# Altium PCB BetaBake_REV_1.0.PcbDoc (part 7 of 8)
Units mil, origin at the board's own origin, x right, y up, seen from the top; angles counter-clockwise.
Board outline 6000 x 4000 mil, 8 copper layers (USB 2.0 (90 Diff) DDR3 Data (50-100), GND (Top Layer high-speed return paths), DDR3 Fly-by Routing (Address, Command, Control), QSPI Flash (Clk, IO), Int4 PWR, Int5 GND (Shielding between L4 and L6), Int6 eMMC High-Speed Data Lines (8-bit bus), SDIO/peripherals, Int7 GND, Escapes, non-critical tracks, decoupling capacitor vias), stack 60.424 mil thick; 426 components, 331 nets, 1941 pads, 428 vias.
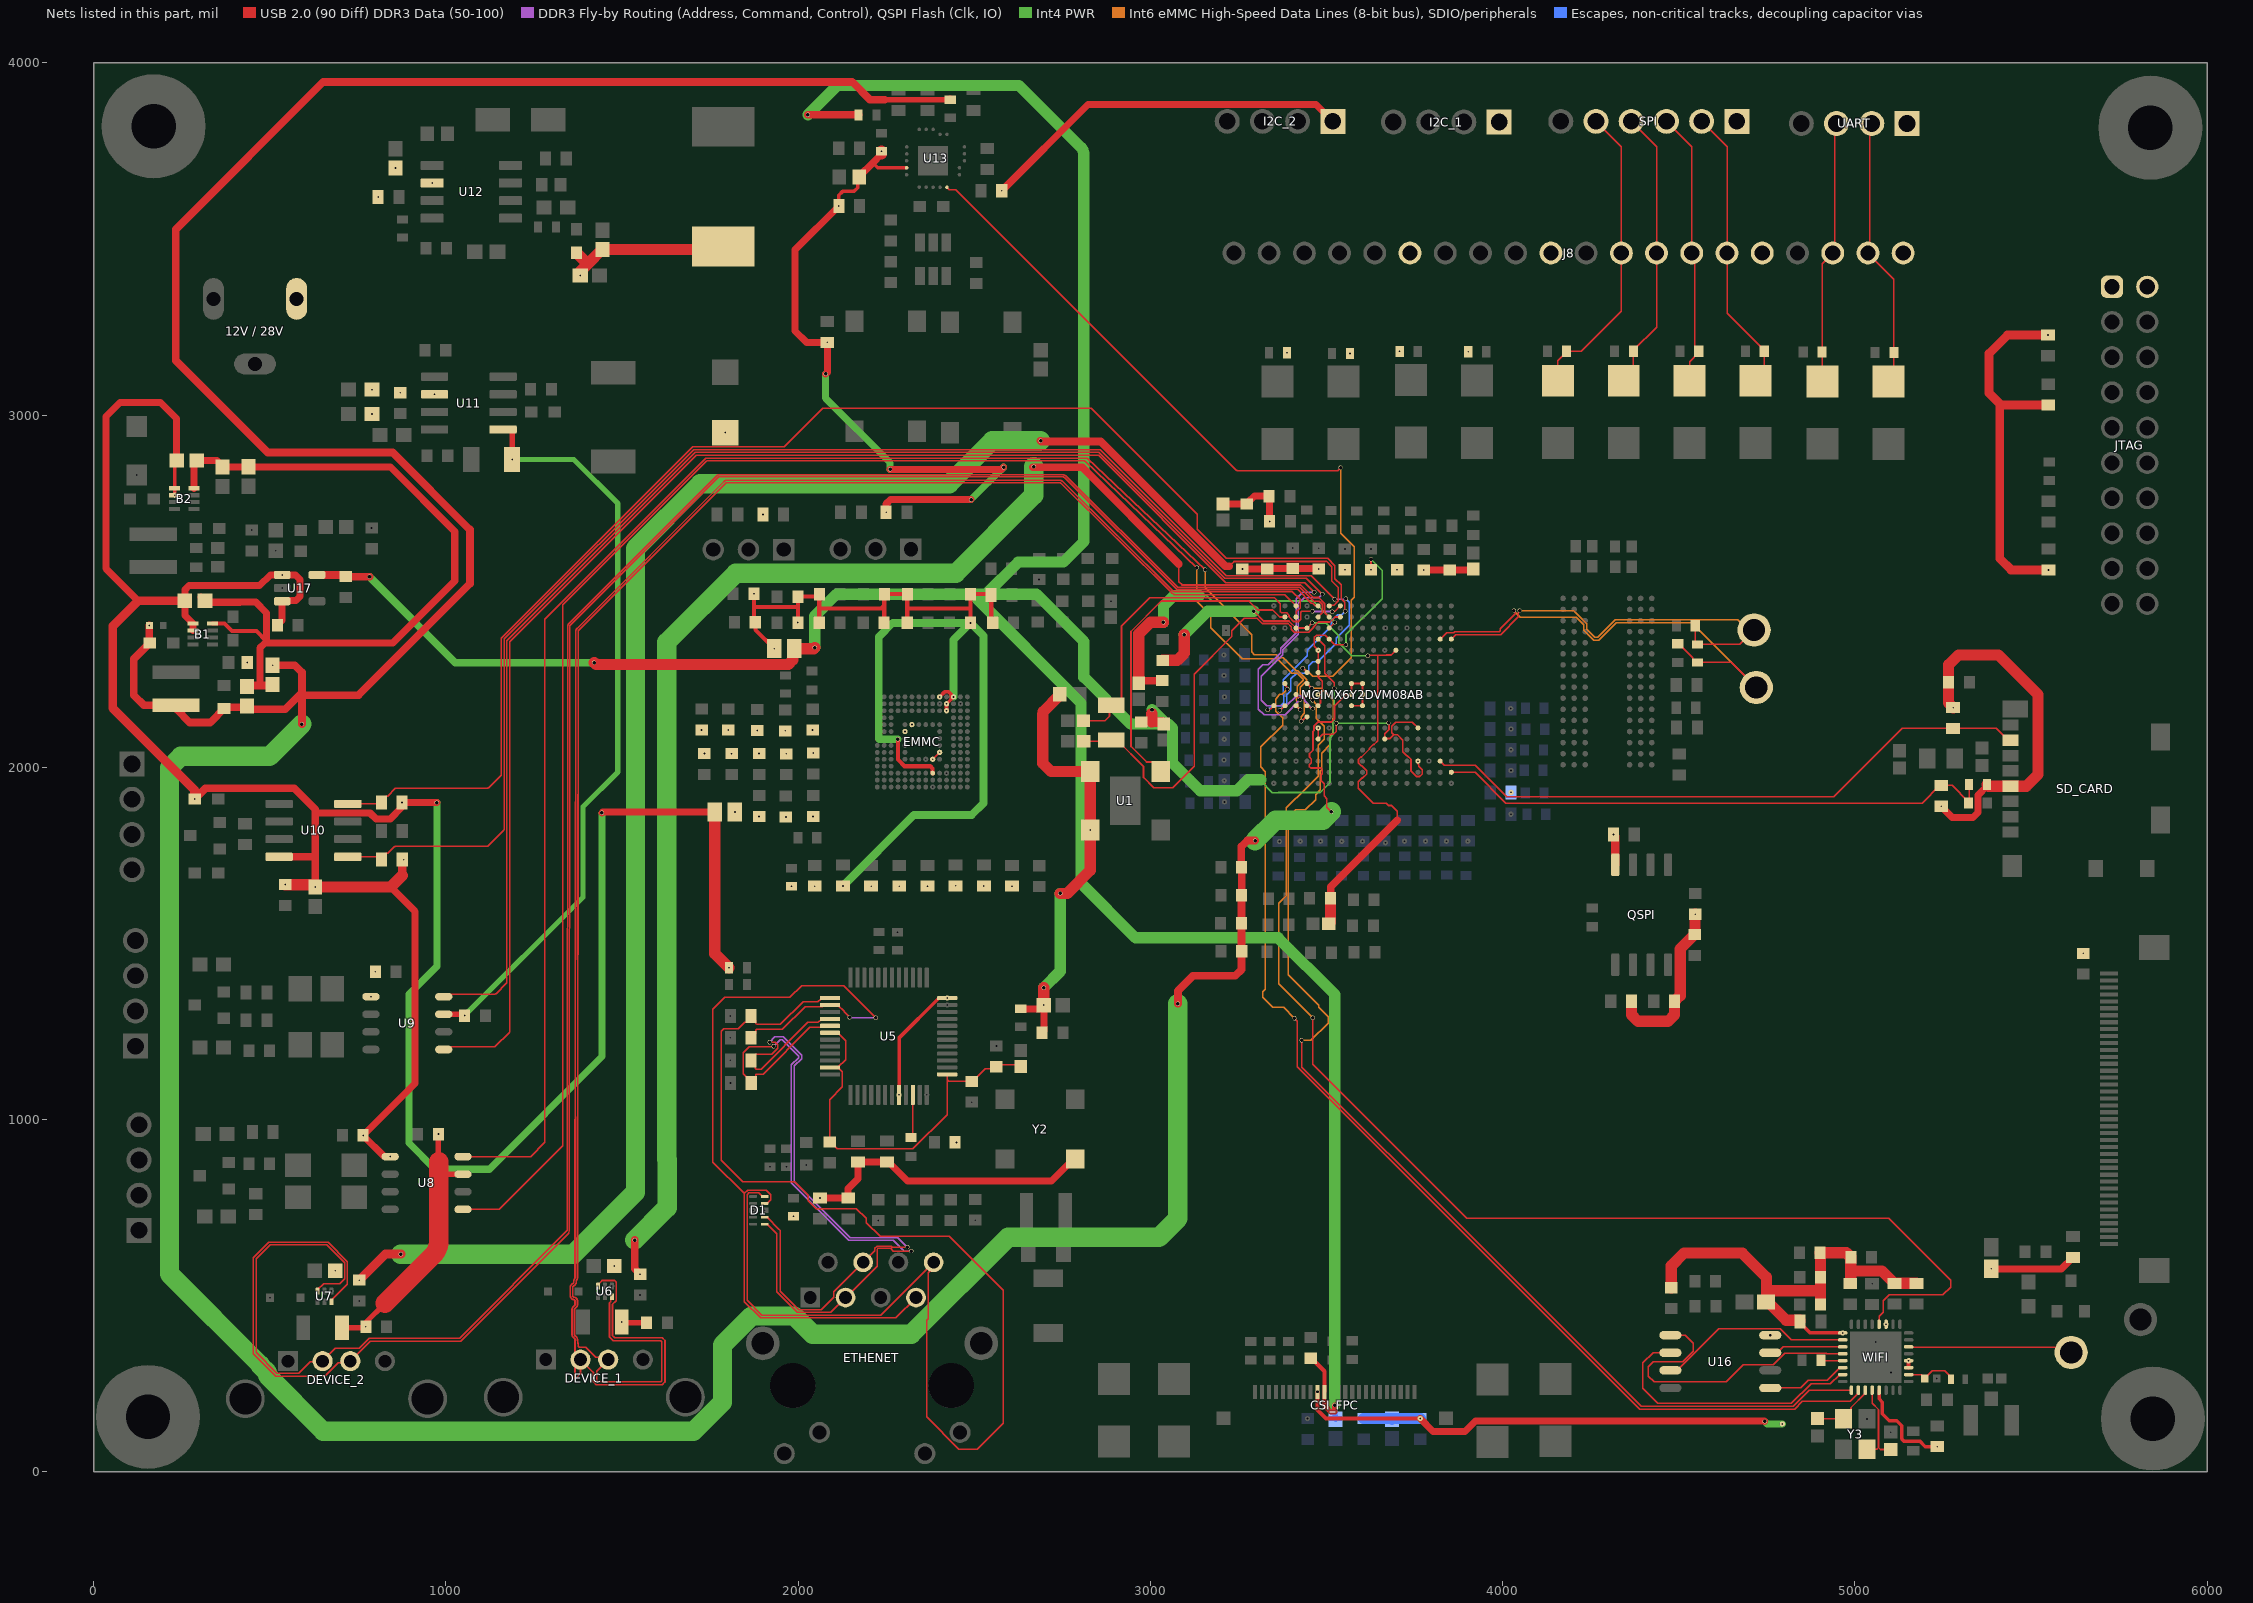
[diagram p12: the nets of this part, all layers, seen from the top]

## Via types
v1: diameter 12, hole 10, USB 2.0 (90 Diff) DDR3 Data (50-100) to Escapes, non-critical tracks, decoupling capacitor vias, 382 vias
v2: diameter 50, hole 26, USB 2.0 (90 Diff) DDR3 Data (50-100) to Escapes, non-critical tracks, decoupling capacitor vias, 28 vias
v3: diameter 19.68, hole 7.87, USB 2.0 (90 Diff) DDR3 Data (50-100) to Escapes, non-critical tracks, decoupling capacitor vias, 9 vias
v4: diameter 23.62, hole 11.81, USB 2.0 (90 Diff) DDR3 Data (50-100) to Escapes, non-critical tracks, decoupling capacitor vias, 5 vias
v5: diameter 7.87, hole 7.87, USB 2.0 (90 Diff) DDR3 Data (50-100) to Escapes, non-critical tracks, decoupling capacitor vias, 4 vias

## Nets (pads, with @x,y where several pads share a name; then routed paths per layer and width w, separated by ;. In a path a pad name is that pad's centre, name@x,y a point inside that pad or via, vN(x,y) a via of type N, cw(c..) or ccw(c..) an arc to the next point about the centre after c; other vN are vias at no path point) (continued)
NetU8_1: MCIMX6Y2DVM08AB.H15 U8.1 | length 4607.2
  USB 2.0 (90 Diff) DDR3 Data (50-100) w4: U8.1@1048.35,745 1151,745 1330.35,924.35 ccw(c1327.52,927.18) 1331.52,927.18 1331.52,2459.89 cw(c1335.52,2459.86) 1332.67,2462.67 1738.67,2868.67 cw(c1741.5,2865.84) 1741.5,2869.84 2812.12,2869.84 cw(c2812.12,2865.84) 2814.92,2868.7 ; 2814.94,2868.68 v1(3132,2567) ; MCIMX6Y2DVM08AB.H15@3413.27,2174.99 3413.64,2174.99 3424.63,2164 v1(3425,2164)
  Int6 eMMC High-Speed Data Lines (8-bit bus), SDIO/peripherals w4: v1(3132,2567) 3132,2471 3171.97,2431.03 3171.97,2396.76 3260.24,2308.49 3359.49,2308.49 3401,2266.97 3401.29,2267.26 3416.24,2267.26 3433.49,2250.02 3433.49,2246.7 3417,2230.21 3417,2202.08 3416.17,2201.25 ccw(c3419,2198.43) 3415.02,2198.82 3414.41,2192.63 ccw(c3424.36,2191.64) 3414.44,2190.38 3414.86,2187.08 ccw(c3418.83,2187.58) 3415.98,2184.78 ; 3416,2184.76 3416.17,2184.58 3416.17,2183.4 3417.93,2181.64 3417.93,2171.07 v1(3425,2164)
NetU8_4: MCIMX6Y2DVM08AB.G14 U8.4 | length 4557.6
  USB 2.0 (90 Diff) DDR3 Data (50-100) w4: U8.4@1048.35,895 1241,895 1281,935 1281,2421 1738.19,2878.19 2817.97,2878.19 cw(c2817.97,2874.19) 2820.72,2877.1 v1(3155,2561) ; v1(3428,2131) 3430.13,2131 3442.63,2143.5 MCIMX6Y2DVM08AB.G14@3444.76,2143.5
  Int6 eMMC High-Speed Data Lines (8-bit bus), SDIO/peripherals w4: v1(3155,2561) 3155,2509.32 3287.28,2377.04 3287.28,2327.53 3295.22,2319.59 3356.86,2319.59 3364.8,2311.66 3377,2311.66 3414.54,2274.11 3417.88,2274.11 3443.39,2248.6 3443.39,2245.29 3425,2226.9 3425,2207.97 3437,2195.97 3437,2153.03 3428,2144.03 v1(3428,2131)
NetU9_1: MCIMX6Y2DVM08AB.J15 U9.1 | length 4567.4
  USB 2.0 (90 Diff) DDR3 Data (50-100) w4: U9.1@993.69,1199 999.88,1205.19 cw(c1002.71,1202.36) 1002.71,1206.36 1137.34,1206.36 ccw(c1137.34,1210.36) 1140.16,1207.52 1179.84,1247.2 ccw(c1177,1250.02) 1181,1250.02 1181,2355.06 cw(c1185,2355.03) 1182.15,2357.83 1709.22,2884.91 cw(c1712.05,2882.08) 1712.05,2886.08 2811,2886.08 2852.92,2886.08 3214.5,2524.5 3437.5,2524.5 v1(3465,2497) ; MCIMX6Y2DVM08AB.J15@3413.27,2206.49 3413.27,2204.61 MCIMX6Y2DVM08AB.J15@3415.4,2202.48 ; MCIMX6Y2DVM08AB.J15@3415.43,2202.45 cw(c3412.54,2199.68) 3415.63,2202.23 v1(3424.36,2191.64)
  DDR3 Fly-by Routing (Address, Command, Control), QSPI Flash (Clk, IO) w4: v1(3424.36,2191.64) 3384.21,2150.21 cw(c3381.34,2153) 3381.34,2149 3322.51,2149 3306.51,2165 3306.51,2278.59 3318.92,2291 3335,2291 3370.05,2326.05 3370.05,2337.91 3414.18,2382.04 3414.18,2479.18 3432,2497 v1(3465,2497)
NetU9_4: MCIMX6Y2DVM08AB.H14 U9.4 | length 4467.7
  USB 2.0 (90 Diff) DDR3 Data (50-100) w4: U9.4@993.69,1349 999.88,1355.19 cw(c1002.71,1352.36) 1002.71,1356.36 1139.34,1356.36 ccw(c1139.34,1360.36) 1142.16,1357.52 1171.84,1387.2 ccw(c1169,1390.02) 1173,1390.02 1173,2358.37 cw(c1177,2358.34) 1174.15,2361.15 1705.91,2892.91 cw(c1708.74,2890.08) 1708.74,2894.08 2852.26,2894.08 cw(c2852.26,2890.08) 2855.09,2892.91 3205.83,2542.17 3210.49,2537.51 3442.49,2537.51 v1(3488,2492) ; MCIMX6Y2DVM08AB.H14@3444.76,2174.99 3447.62,2174.99 3454.08,2168.53 3459.47,2168.53 v1(3461,2167)
  DDR3 Fly-by Routing (Address, Command, Control), QSPI Flash (Clk, IO) w4: v1(3461,2167) 3459.83,2167 3437.94,2188.89 3437.94,2192.21 3427.14,2203 3414.88,2203 3386.29,2174.41 3330.96,2174.41 3314.51,2190.86 3314.51,2258.31 3376.05,2319.85 3376.05,2334.19 3420.18,2378.32 3420.18,2465.37 3436.89,2482.08 3478.08,2482.08 v1(3488,2492)
NetU13_20: MCIMX6Y2DVM08AB.L14 U13.20 | length 2199.4
  USB 2.0 (90 Diff) DDR3 Data (50-100) w4: U13.20@2422.45,3646.74 2428.77,3640.43 2447.55,3640.43 3244.14,2843.83 ; 3244.16,2843.81 ccw(c3246.97,2846.66) 3246.97,2842.66 3531.37,2842.66 3539.72,2851 v1(3540,2851) ; v1(3432.75,2281.87) 3432.75,2281.68 3444.76,2269.67 MCIMX6Y2DVM08AB.L14@3444.76,2269.48
  Int6 eMMC High-Speed Data Lines (8-bit bus), SDIO/peripherals w4: v1(3432.75,2281.87) 3434.61,2281.87 3442.17,2274.32 3444.99,2274.32 3460.31,2259 3518,2259 3570.75,2311.75 3570.75,2474.78 3579,2483.03 3579,2626.03 3540,2665.03 v1(3540,2851)
NetU15_6: WIFI.6 WIFI_TOUT.1 | length 468.1
  USB 2.0 (90 Diff) DDR3 Data (50-100) w4: WIFI.6@5152.5,354.83 5153.62,353.72 5599.28,353.72 WIFI_TOUT.1@5614,339
NetU15_12: MCIMX6Y2DVM08AB.J14 WIFI.12 | length 3527.8
  USB 2.0 (90 Diff) DDR3 Data (50-100) w4: MCIMX6Y2DVM08AB.J14@3444.76,2206.49 3444.76,2205.86 3450.41,2200.21 ccw(c3453.24,2203.04) 3450.62,2200.02 3460.95,2191.05 3460.95,2190.95 v1(3460.3,2190.3) ; v1(3461,1289) 3461,1157 3898.34,719.66 5096.34,719.66 5272,544 5272,524 5250,502 5096.91,502 5080,485.09 5080,453 5068.84,441.84 WIFI.12@5068.84,418.81
  Int6 eMMC High-Speed Data Lines (8-bit bus), SDIO/peripherals w4: v1(3460.3,2190.3) 3471,2179.6 3471,2139.13 3493.13,2117 3493.13,2079.65 3476.26,2062.78 3476.26,1974.27 3442.85,1940.86 3441.89,1940.86 3385.87,1884.84 3385.87,1634.91 3365,1614.05 3365,1385 v1(3461,1289)
NetU15_25: MCIMX6Y2DVM08AB.K14 WIFI.25 | length 3276.9
  USB 2.0 (90 Diff) DDR3 Data (50-100) w4: v1(3429,1225) 3429,1150.24 3430.17,1149.07 3917.24,662 4393.24,186 4825,186 4870.8,231.8 WIFI.25@4990.1,231.8 ; MCIMX6Y2DVM08AB.K14@3444.76,2237.98 v1(3457.86,2225.14)
  Int6 eMMC High-Speed Data Lines (8-bit bus), SDIO/peripherals w4: v1(3429,1225) 3455.69,1225 3504.34,1273.66 3504.34,1291.66 3477.48,1318.52 3477.48,1325 3391.87,1410.61 3391.87,1857.91 3412.91,1878.96 3440.04,1878.96 3469,1907.92 3469,1922.42 3482.32,1935.75 3482.32,1988.73 3486.25,1992.66 3486.25,2040.64 3510.78,2065.17 3510.78,2089.42 3518.16,2096.81 3518.16,2106.14 3519.26,2107.24 3519.26,2119.6 3518,2120.86 3518,2137.48 3519.26,2138.73 3519.26,2190.41 3484.53,2225.14 v1(3457.86,2225.14)
NetU15_26: MCIMX6Y2DVM08AB.K16 WIFI.26 | length 3232.3
  USB 2.0 (90 Diff) DDR3 Data (50-100) w4: MCIMX6Y2DVM08AB.K16@3381.77,2237.98 3381.77,2235.12 3387.47,2229.43 3387.47,2223.77 v1(3389,2222.24) ; v1(3409,1288) 3409,1287.03 3417,1279.03 3417,1150 4389,178 4829,178 4851,200 4986.84,200 5009.79,222.94 WIFI.26@5009.79,231.8
  Int6 eMMC High-Speed Data Lines (8-bit bus), SDIO/peripherals w4: v1(3389,2222.24) 3374.1,2207.34 3367.37,2207.34 3358.33,2198.3 3358.33,2195.47 3356,2193.14 3356,2159.39 3375,2140.39 3375,2120.03 3313,2058.03 3313,2001.31 3326.65,1987.66 3326.65,1370.35 3319,1362.69 3319,1347.51 3347.99,1318.52 3378.48,1318.52 v1(3409,1288)
NVCC_CSI: B1.1 B1.2 B2.1 B2.2 C1.1 C2.1 C3.1 C6.1 C15.1 C16.1 C17.1 C22.1 C23.1 C27.1 C30.2 C31.2 C37.1 C38.1 C39.1 C50.2 C81.1 C82.1 C83.1 C91.2 C98.2 C106.2 C111.2 C114.2 C115.2 C116.1 C127.2 C130.2 C131.2 C138.2 C144.1 C152.2 C154.2 C159.2 C164.2 C167.2 C169.2 C170.2 C245.1 C356.2 CSI_FPC.10 FB1.1 FB4.2 FB6.1 I2C_1.1 I2C_2.1 J8.1 J8.5 J8.11 J8.15 JTAG.1 JTAG.2 L5.2 MCIMX6Y2DVM08AB.C4 MCIMX6Y2DVM08AB.E7 MCIMX6Y2DVM08AB.E13 MCIMX6Y2DVM08AB.F4 MCIMX6Y2DVM08AB.F13 MCIMX6Y2DVM08AB.H13 MCIMX6Y2DVM08AB.J13 MCIMX6Y2DVM08AB.L13 MCIMX6Y2DVM08AB.M13 MCIMX6Y2DVM08AB.N13 MCIMX6Y2DVM08AB.P12 pad.18 pad.19 pad.21 pad.22 pad.23 pad.24 pad.27 pad.28 pad.29 pad.45 pad.46 pad.61 pad.62 pad.67 pad.69 pad.71 pad.73 pad.74 pad.134 pad.165 pad.189 pad.190 pad.192 pad.193 pad.196 pad.206 pad.211 pad.227 pad.229 pad.233 pad.242 pad.248 pad.249 pad.251 pad.252 pad.253 pad.254 pad.255 pad.256 pad.257 pad.258 pad.259 pad.260 pad.261 pad.262 pad.266 pad.267 pad.268 pad.269 pad.270 pad.271 pad.273 pad.302 pad.305 pad.306 pad.307 pad.309 pad.310 pad.311 pad.312 pad.314 pad.315 pad.318 pad.321 pad.323 pad.324 QSPI.8 R1.2 R2.2 R3.2 R4.2 R5.1 R48.2 R49.2 R52.1 R66.1 R67.1 R68.1 R71.2 R72.2 R74.2 R75.2 R77.2 R82.2 R85.1 R97.1 R99.1 R100.2 R104.1 R131.1 R132.1 R133.1 R147.2 R156.2 R157.2 R158.2 R160.1 R179.1 R180.1 R181.2 R182.2 R183.2 SD_CARD.4 SPI.1 U1.1 U1.4 U5.32 U5.48 U8.5 U9.5 U10.8 U13.14 U16.8 U17.1 U17.3 UART.1 VDD_SNVS.1 WIFI.3 WIFI.4 WIFI.11 WIFI.17 WIFI.29 Y2.4 | length 22134.4
  USB 2.0 (90 Diff) DDR3 Data (50-100) w4: MCIMX6Y2DVM08AB.J13@3476.26,2206.49 3487.54,2217.77 3487.54,2244.32 3476.26,2255.61 MCIMX6Y2DVM08AB.L13@3476.26,2269.48 ; MCIMX6Y2DVM08AB.N13@3476.26,2332.47 3464.98,2343.76 3464.98,2368.64 3471.59,2375.25 3496.47,2375.25 MCIMX6Y2DVM08AB.P12@3507.76,2363.97 3523.72,2348 v1(3555,2348)
  USB 2.0 (90 Diff) DDR3 Data (50-100) w5: MCIMX6Y2DVM08AB.F13@3476.26,2112 MCIMX6Y2DVM08AB.E13@3476.26,2080.5 3489.7,2093.94 3519.67,2093.94 3527.47,2101.73 3527.47,2124.47 v1(3528,2125) ; MCIMX6Y2DVM08AB.H13@3476.26,2174.99 3482.97,2181.7 3482.97,2199.78 MCIMX6Y2DVM08AB.J13@3476.26,2206.49 ; MCIMX6Y2DVM08AB.L13@3476.26,2269.48 MCIMX6Y2DVM08AB.N13@3476.26,2332.47 ; C31.2@3626.24,2560.98 v1(3626.24,2590.51) ; v1(3676,2126) 3677.02,2124.98 3677.02,2107.12 3665.24,2095.34 3665.24,2082.89 3666.43,2081.7 3680.02,2081.7 3690.61,2092.29 ; MCIMX6Y2DVM08AB.C4@3759.72,2017.51 3761.55,2003.09 3771.51,1993.14 3771.51,1981.14 3764.61,1974.23 3754.77,1974.23 3740.01,1988.99 3740.01,2022.39 3729.14,2033.26 3727.31,2033.26 3716.44,2044.13 3716.44,2077.46 3701.61,2092.29 3690.61,2092.29 ; MCIMX6Y2DVM08AB.F4@3759.72,2112 3743.72,2128 3696.07,2128 3684.95,2116.88 3684.95,2097.95 3690.61,2092.29
  USB 2.0 (90 Diff) DDR3 Data (50-100) w10: B2.2@229.86,2772.68 B2.1@229.86,2792.37 229.86,2865.49 C138.2@235.37,2871 ; R157.2@2115.47,3594 2115.47,3624.47 2126,3635 2158,3635 2169,3646 2169,3673.43 C144.1@2173.54,3677.97 ; 2211.93,3716.35 2225.85,3702.43 U13.14@2307.7,3702.43 ; U5.32@2286.26,1070.32 2286.26,1231.64 2399.55,1344.93 U5.48@2423.07,1344.93 ; R179.1@4844.47,427 4844.47,423.06 4873.33,394.2 WIFI.17@4965.5,394.2 ; WIFI.29@5068.84,231.8 5068.84,207.16 5078,198 5078,165 5098,145 5118.82,145 5133,130.82 5133,93.3 5138.86,87.44 5183.72,87.44 5199.68,71.47 R181.2@5234,71.47
  USB 2.0 (90 Diff) DDR3 Data (50-100) w12: v5(3474.43,227) 3474.43,175.78 3498.68,151.53 pad.248@3766,151.53 ; WIFI.3@5152.5,295.78 WIFI.4@5152.5,315.46
  USB 2.0 (90 Diff) DDR3 Data (50-100) w20: 126,2473 35,2564 35,2996 75,3036 190,3036 235.37,2990.63 C138.2@235.37,2871 ; B1.2@281.86,2388.37 B1.1@281.86,2408.06 258.74,2431.17 C127.2@258.74,2473 258.74,2504.28 270.46,2516 471,2516 501.4,2546.4 U17.1@535,2546.4 572.6,2546.4 586,2533 586,2485 574.21,2473.21 536.61,2473.21 U17.3@535,2471.6 535,2417.53 C245.1@521.47,2404 ; 629,1869 629.76,1869.76 785.24,1869.76 801,1854 842.16,1854 875.53,1887.37 R97.1@875.53,1900 v1(974,1900) ; U8.5@841.65,895 825,895 C106.2@765,955 912,1102 912,1591.33 843.16,1660.16 ; v1(1443,1871) 1444.91,1872.91 FB1.1@1763.23,1872.91 ; R72.2@2062,777.53 2062.47,777.06 R74.2@2142,777.06 2142,804 2170,832 R77.2@2170,879.47 2170.53,880 R82.2@2252,880 2255.94,880 2309.94,826 2719,826 Y2.4@2787,894 ; v1(2078,3117) 2082.68,3121.68 R158.2@2082.68,3206.69 2023.31,3206.69 1991,3239 1991,3469.53 R157.2@2115.47,3594 ; C144.1@2173.54,3676 2173.54,3677.97 2211.93,3716.35 R160.1@2236.61,3741.03 ; VDD_SNVS.1@2249.86,2724.17 2249.86,2748.28 2261.57,2760 v1(2491,2760) ; v1(2261,2846) 2577,2846 v1(2583,2852) ; R156.2@2578.06,3637 2822.49,3881.43 3470.57,3881.43 I2C_2.1@3518,3834 ; R85.1@2632,1314.59 2687.02,1314.59 C91.2@2697.43,1325 2697.43,1250.95 C98.2@2692.47,1246 ; C1.1@3206,2747.33 3206.34,2747.66 3274.63,2747.66 3280.72,2753.75 3280.72,2755.72 3295,2770 C38.1@3337,2770 3337.74,2769.26 3337.74,2698.74 C37.1@3338.47,2698 ; C2.1@3261.36,2563.26 pad.311@3261.46,2563.36 3332.14,2563.36 C15.1@3332.24,2563.46 3332.76,2563.98 C27.1@3404.24,2563.98 3477.18,2563.98 C17.1@3478.24,2562.93 ; pad.248@3766,151.53 3784.07,133.46 3784.07,132.67 3802.13,114.61 3893.25,114.61 3922.75,144.11 4742.89,144.11 v1(4744,143) ; C16.1@3776.24,2559.98 C30.2@3849.24,2559.98 3913.24,2559.98 C6.1@3916.24,2562.98 ; R49.2@5245,1889.47 5276.47,1858 5335,1858 5349,1872 5349,1920.88 5375.18,1947.06 R48.2@5375.18,1951 ; FB4.2@5387,576.45 5586.97,576.45 R104.1@5619,608.47
  USB 2.0 (90 Diff) DDR3 Data (50-100) w22: R100.2@286.54,1910 317.54,1941 569,1941 629,1881 629,1869 629,1748 ; U10.8@526.5,1746.14 627.14,1746.14 629,1748 ; C114.2@629,1660.16 629,1748
  USB 2.0 (90 Diff) DDR3 Data (50-100) w23: R67.1@4314.68,1809.36 4319.68,1804.36 QSPI.8@4319.68,1723.52
  USB 2.0 (90 Diff) DDR3 Data (50-100) w25: C127.2@258.74,2473 126,2473 54,2401 54,2168 286.54,1935.46 R100.2@286.54,1910 ; 876,1693 876,1734.01 pad.21@879.99,1738 ; R132.1@5548,3227.53 5433.53,3227.53 5381,3175 5381,3062 5411,3032 ; R131.1@5549,3028.47 5414.53,3028.47 5411,3032 ; R133.1@5550,2560.47 5443.53,2560.47 5411,2593 5411,3032
  USB 2.0 (90 Diff) DDR3 Data (50-100) w32: C115.2@544,1667.06 622.11,1667.06 C114.2@629,1660.16 843.16,1660.16 876,1693 ; R147.2@1371,3461.07 1402.61,3429.46 ; C131.2@1381,3396 1381,3407.85 1402.61,3429.46 ; FB1.1@1763.23,1872.91 1763.23,1471.18 R75.2@1803.41,1431 ; L5.2@1787,3454 1771,3470 C130.2@1444,3470 1443.15,3470 1402.61,3429.46 ; R160.1@2236.61,3741.03 R160.1@2236.61,3749 ; v1(2697,1374) 2697.43,1373.57 C91.2@2697.43,1325 ; C3.1@2742.46,2207 2742.46,2205.03 2695,2157.57 2695,2152 2694,2151 2694,2012 2718,1988 U1.4@2829,1988 U1.1@2829,1822 2829,1707 2764,1642 v1(2744,1642) ; R66.1@4366.06,1336 4366.06,1297.75 4384.8,1279 4469.31,1279 4488.06,1297.75 R68.1@4488.06,1336 4504,1351.94 4504,1484.46 4544.54,1525 C81.1@4546,1525 4546,1582 C82.1@4547,1583 ; C167.2@4479,522.53 4479,585 4515,621 4680,621 4748.94,552.06 4748.94,517.5 ; R179.1@4844.47,427 4844.47,430.43 4844.22,430.69 4804.19,430.69 4752.88,482 FB6.1@4748,482 4748.94,482.94 4748.94,517.5 ; C169.2@4902.53,475 4902.53,514 ; R180.1@4987,534.77 4988.22,534.77 4988.47,535.02 4988.47,570.2 ; R183.2@5175,535.06 R182.2@5112,535.06 5076.85,570.2 4988.47,570.2 ; R52.1@5279,2169.53 5266,2182.53 C50.2@5266,2241 5266,2291 5294,2319 5408,2319 5520,2207 5520,1980 5486.68,1946.68 SD_CARD.4@5441.62,1946.68 5379.5,1946.68 R48.2@5375.18,1951 ; 4748.94,517.5 4752.44,514 4902.53,514 ; 4902.53,514 C170.2@4902.53,553 4902.53,621 C159.2@4901.53,622 4975.47,622 4986.76,610.72 4988.22,610.72 4988.47,610.46 C164.2@4988.47,609 4988.47,570.2
  Int4 PWR w4: pad.302@3700.24,2557.05 pad.302@3700.24,2560.98
  Int4 PWR w5: v1(3528,2125) 3528.5,2125.5 3675.5,2125.5 v1(3676,2126) ; v1(3555,2348) 3555,2375.95 3658,2478.95 3658,2558.75 v1(3626.24,2590.51)
  Int4 PWR w20: v1(974,1900) 974,1435 895,1356 895,933 969,859 1123.28,859 1443,1178.72 v1(1443,1871) ; v1(2078,3117) 2078,3048 2261,2865 v1(2261,2846) ; v1(2491,2760) v1(2583,2852) ; v1(4744,143) 4751,136 pad.211@4794,136
  Int4 PWR w32: v1(2697,1374) 2744,1421 v1(2744,1642)
  Escapes, non-critical tracks, decoupling capacitor vias w32: C154.2@3606,151.53 3684.05,151.53 C152.2@3686,149.58 3687.69,151.28 3765.75,151.28 pad.248@3766,151.53
  other v5: 4759.73,388 5730.09,3364.3 5830.09,3364.3
NVCC_PLL: C4.1 C5.1 C142.1 C153.2 C155.2 CSI_FPC.11 FB2.1 MCIMX6Y2DVM08AB.P13 R161.1 U17.5 | length 9773
  USB 2.0 (90 Diff) DDR3 Data (50-100) w4: MCIMX6Y2DVM08AB.P13@3476.26,2363.97 3494.57,2345.66 3494.57,2266.71 3507.31,2253.97 3507.73,2253.97 3521.97,2239.73 v1(3522,2224)
  USB 2.0 (90 Diff) DDR3 Data (50-100) w10: 3494,200 3494,226.89 CSI_FPC.11@3494.11,227
  USB 2.0 (90 Diff) DDR3 Data (50-100) w12: C155.2@3455.28,322.47 3457.25,322.47 3494.11,285.61 CSI_FPC.11@3494.11,227
  USB 2.0 (90 Diff) DDR3 Data (50-100) w15: 3494,200 3494,188 3512.09,169.91 3523.64,169.91 v1(3523.64,189.6)
  USB 2.0 (90 Diff) DDR3 Data (50-100) w22: U17.5@633.82,2546.4 701.19,2546.4 cw(c701.19,2524.4) 701.59,2546.4 708.28,2546.28 C142.1@715,2541.53 715.53,2541 v1(783,2541) ; v1(2027.59,3852.59) R161.1@2171.02,3852.59
  USB 2.0 (90 Diff) DDR3 Data (50-100) w28: 3003.53,2129 3032.96,2129 3038,2123.96 C5.1@3038,2123
  USB 2.0 (90 Diff) DDR3 Data (50-100) w32: v1(1420.7,2297.3) 1425.7,2292.3 1972,2292.3 1984.37,2304.68 1984.37,2332.23 FB2.1@1989.14,2337 2044,2337 v1(2047,2340) ; 3003.53,2129 3003.53,2152.62
  Int4 PWR w4: 3313,1964.7 3313,1962 3346.5,1928.5 3363.56,1928.5 ; 3510,2084.23 3519.26,2093.49 3519.26,2119.6 3518,2120.86 3518,2130.24 3522,2134.24 v1(3522,2224)
  Int4 PWR w5: 3363.56,1928.5 3481.64,1928.5 3510,1956.86 3510,2084.23
  Int4 PWR w22: v1(783,2541) 1026.7,2297.3 v1(1420.7,2297.3)
  Int4 PWR w32: v1(2027.59,3852.59) 2111,3936 2627,3936 2801.63,3761.37 cw(c2779,3738.75) 2811,3738.75 2811,2735 2811,2641.16 2753,2583.16 2625.16,2583.16 2533.8,2491.8 ; v1(2047,2340) 2047,2429.58 2109.21,2491.8 2494.2,2491.8 ; v1(3004.47,2163.38) 3044.85,2123 ; 3313,1964.7 3276.52,1964.7 3245.2,1933.37 3141.84,1933.37 3062.83,2012.38 3062.83,2111.46 3051.3,2123 3044.85,2123 ; v1(3523.64,189.6) 3523.64,1355 3362.64,1516 2958,1516 2803,1671 2803,2183 2494.2,2491.8 ; 2494.2,2491.8 2533.8,2491.8 ; 2533.8,2491.8 2676.06,2491.8 2811,2356.85 2811,2256 2944,2123 3044.85,2123
  Escapes, non-critical tracks, decoupling capacitor vias w15: v1(3523.64,189.6) 3523.64,163.83 C153.2@3526,149.58
PFBIN1: C94.1 C95.1 C96.1 C97.1 U5.18 U5.23 U5.37 | length 1147
  USB 2.0 (90 Diff) DDR3 Data (50-100) w4: U5.23@2090.39,1148.08 U5.23@2113.03,1148.08 ; U5.18@2090.39,1246.5 2113.03,1246.5 2135.38,1224.16 2135.4,1170.45 U5.23@2113.03,1148.08 ; U5.37@2398.48,1124.49 2402.38,1128.39 U5.37@2423.07,1128.39 2423.07,1112.53 ; C96.1@2632,1150.67 2616.16,1155 2568,1155 C95.1@2563,1150 2558,1145 2531.44,1145 2494.97,1108.53 C94.1@2493,1108.53 2427.07,1108.53 2423.07,1112.53 ; U5.23@2113.03,1148.08 2124.94,1136.17 2124.94,1092.96 2089,1057 C97.1@2089,936.53 2090.97,936.53 2110.72,916.78 2325.58,916.78 2423.07,1014.27 2423.07,1112.53
PGND: B1.8 B2.8 C122.1 C123.1 C127.1 C132.1 C133.1 C138.1 | length 2307.4
  USB 2.0 (90 Diff) DDR3 Data (50-100) w12: B1.8@336.98,2408.06 371.1,2408.06 392.43,2386.72 462.28,2386.72 491,2358
  USB 2.0 (90 Diff) DDR3 Data (50-100) w20: B2.8@284.98,2792.37 C138.1@284.98,2861.08 ; C138.1@292.63,2871.9 293.53,2871 349.53,2871 366,2854.53 C133.1@366,2852.58 366.5,2853.08 437.5,2853.08 438,2852.58 842.42,2852.58 1025,2670 1025,2529 849,2353 486,2353 ; C127.1@305.18,2482.92 315.1,2473 C127.1@316,2473 ; 414,2469 460,2469 491,2438 491,2358 486,2353 ; 471.5,2232.29 471.5,2338.5 486,2353
  USB 2.0 (90 Diff) DDR3 Data (50-100) w22: C127.1@316,2473 320,2469 414,2469 ; C122.1@435,2229.58 437.71,2232.29 471.5,2232.29 505.29,2232.29 C123.1@508,2235
RD_N: D1.5 ETHENET.8 R83.1 U5.13 | length 3783.2
  USB 2.0 (90 Diff) DDR3 Data (50-100) w4: D1.5@1904.87,781.74 1897.69,781.74 1887.75,791.68 1859.55,791.68 1854.88,787.01 1854.88,486.47 1896.6,444.74 2234.5,444.74 ETHENET.8@2384.5,594.74 2384.5,580.67 2368.9,565.06 2368.9,434 2364.5,429.61 2364.5,155.83 2456.31,64.03 2507.97,64.03 2581.5,137.56 2581.5,515.81 2428.31,669 2232.35,669 2193.81,707.54 2193.81,719.19 2165.47,747.53 2050.91,747.53 2029,769.44 2029,785 1989.82,824.18 1843.1,824.18 1782.15,885.13 1782.15,1250.91 1789.1,1257.85 1830.07,1257.85 1848.7,1276.48 1852.64,1276.48 1866.39,1290.23 R83.1@1866.39,1294.17 1879.48,1281.08 1879.48,1272.51 1881.82,1270.17 1949.17,1270.17 2013.93,1334.93 2055.8,1334.93 2063.85,1341.02 U5.13@2090.39,1344.93
RD_P: D1.4 ETHENET.7 R79.2 U5.14 | length 2436
  USB 2.0 (90 Diff) DDR3 Data (50-100) w4: R79.2@1866.39,1232.17 1879.48,1245.26 1879.48,1253.82 1881.82,1256.17 1954.96,1256.17 2019.73,1320.93 U5.14@2069.15,1320.93 ; D1.4@1904.87,762.06 1912.06,762.06 1922,771.99 1922,787.01 1909.33,799.68 1856.23,799.68 1846.88,790.32 ; U5.14@2090.39,1325.24 2113.03,1325.24 2130.16,1308.11 2130.16,1305.84 v1(2146,1290) ; v1(2220,1289) 2129,1380 2009.67,1380 1976.4,1346.73 1791.42,1346.73 1758.15,1313.47 1758.15,879.05 1846.88,790.32 ; ETHENET.7@2334.5,494.74 2276.5,436.74 1893.29,436.74 1846.88,483.15 1846.88,790.32
  DDR3 Fly-by Routing (Address, Command, Control), QSPI Flash (Clk, IO) w4: v1(2146,1290) 2146.5,1289.5 2219.5,1289.5 v1(2220,1289)
RTC_XTALI: C29.1 MCIMX6Y2DVM08AB.U11 Y1.1 | length 1083.3
  USB 2.0 (90 Diff) DDR3 Data (50-100) w4.92: C29.1@2810.33,2132 2871,2132 2884,2145 2884,2170.96 Y1.1@2889.24,2176.2 2898.51,2176.2 2917.7,2195.39 2917.7,2400.3 2998.52,2481.12 3105.34,2481.12 3352.36,2481.12 3368.94,2464.54 3368.94,2442.06 3372.3,2438.7 3386.64,2438.7 3393.52,2431.83 3393.52,2427.28 3407,2413.79 3420.18,2413.79 3427,2420.61 3427,2440.12 3429.88,2443 v1(3460,2443) ; v1(3516,2442) 3517.35,2443.35 3524.15,2443.35 MCIMX6Y2DVM08AB.U11@3539.25,2458.46
  DDR3 Fly-by Routing (Address, Command, Control), QSPI Flash (Clk, IO) w4.92: v1(3460,2443) 3460.5,2442.5 3515.5,2442.5 v1(3516,2442)
RTC_XTALO: C28.1 MCIMX6Y2DVM08AB.T11 Y1.2 | length 1206.1
  USB 2.0 (90 Diff) DDR3 Data (50-100) w4.92: C28.1@2810.66,2074 2885.46,2074 Y1.2@2889.24,2077.77 2904.98,2077.77 2980.65,2002.1 2980.65,1971.21 3009.86,1942 3063,1942 3124.36,2003.36 3124.36,2264.67 3231.09,2371.4 3231.09,2387.96 3266.74,2423.6 3302.6,2423.6 3317.99,2408.22 3390.67,2408.22 3399.54,2399.35 3399.54,2392.59 3408.4,2383.72 3449.63,2383.72 3463.27,2397.36 3463.27,2399.08 3476.91,2412.72 3510.13,2412.72 3524.36,2426.96 MCIMX6Y2DVM08AB.T11@3539.25,2426.96
RX_RS485: MCIMX6Y2DVM08AB.H16 R99.2 U10.1 | length 4260.1
  USB 2.0 (90 Diff) DDR3 Data (50-100) w4: U10.1@721.38,1746.14 808.86,1746.14 R99.2@817,1738 817,1741.94 830.75,1755.69 834.69,1755.69 853.19,1774.19 cw(c856.02,1771.36) 856.02,1775.36 1116.34,1775.36 ccw(c1116.34,1779.36) 1119.16,1776.52 1163.84,1821.2 ccw(c1161,1824.02) 1165,1824.02 1165,2361.69 cw(c1169,2361.66) 1166.15,2364.46 1702.59,2900.91 cw(c1705.42,2898.08) 1705.42,2902.08 2855.58,2902.08 cw(c2855.58,2898.08) 2858.41,2900.91 3165.64,2593.67 3215.8,2543.51 3456.49,2543.51 v1(3523,2477) ; v1(3367.69,2161.83) 3368.15,2161.83 3381.31,2174.99 MCIMX6Y2DVM08AB.H16@3381.77,2174.99
  DDR3 Fly-by Routing (Address, Command, Control), QSPI Flash (Clk, IO) w4: v1(3523,2477) 3523.87,2477.87 3554.31,2477.87 v1(3555.17,2478.73)
  Escapes, non-critical tracks, decoupling capacitor vias w4: v1(3367.69,2161.83) 3367.83,2161.83 3386.78,2180.78 3386.78,2205.87 3399,2218.09 3399,2251.33 3414.93,2267.26 3441,2267.26 3450,2276.26 3450,2289.14 3460.93,2300.07 3475.35,2300.07 3527.64,2352.36 3527.64,2366.78 3564.75,2403.89 3564.75,2469.16 v1(3555.17,2478.73)
SD1_CMD: MCIMX6Y2DVM08AB.B1 R48.1 R49.1 R50.1 | length 1600.2
  USB 2.0 (90 Diff) DDR3 Data (50-100) w4: MCIMX6Y2DVM08AB.B1@3854.21,1986.02 3921.58,1986.02 4009.22,1898.37 5190.91,1898.37 5241.06,1948.53 R49.1@5245,1948.53 5275.85,1948.53 5322.36,1902.02 R50.1@5322.36,1899 5324,1900.64 R48.1@5324,1951
SD1_DATA0: MCIMX6Y2DVM08AB.C2 R52.2 SD_CARD.7 | length 1755.4
  USB 2.0 (90 Diff) DDR3 Data (50-100) w4: MCIMX6Y2DVM08AB.C2@3822.72,2017.51 3834,2006.23 3921.77,2006.23 4011.88,1916.12 4940.12,1916.12 5134.47,2110.47 R52.2@5279,2110.47 5401.24,2110.47 5435.12,2076.6 SD_CARD.7@5441.62,2076.6
SDCLK0_N: MCIMX6Y2DVM08AB.P2 R41.1 R47.1 SDCLK0_N.1 | length 1363.2
  USB 2.0 (90 Diff) DDR3 Data (50-100) w4: MCIMX6Y2DVM08AB.P2@3822.72,2363.97 3822.9,2363.97 3841.11,2382.18 3861.11,2382.18 3863.93,2385 3990.66,2385 3993,2387.34 3993,2393 4036,2436 4036,2438.84 4032,2442.84 v1(4032,2445) ; R41.1@4497.36,2350.9 4500.38,2350.9 4539.61,2311.67 4539.61,2307.48 4549.43,2297.67 R47.1@4553.36,2297.67 4649.33,2297.67 SDCLK0_N.1@4720,2227
  Int6 eMMC High-Speed Data Lines (8-bit bus), SDIO/peripherals w4: v1(4032,2445) 4032,2444.03 4050.02,2426.01 4208.96,2426.01 4230.16,2404.81 4230.16,2388.53 4255.69,2363 4258.03,2360.66 4272.97,2360.66 4322.82,2410.51 4536.49,2410.51 SDCLK0_N.1@4720,2227
SDCLK0_P: MCIMX6Y2DVM08AB.P1 R42.1 R47.2 SDCLK0_P.1 | length 1230.8
  USB 2.0 (90 Diff) DDR3 Data (50-100) w4: MCIMX6Y2DVM08AB.P1@3854.21,2363.97 3867.24,2377 3993.97,2377 4044,2427.03 4044,2438.84 4048,2442.84 v1(4048,2445) ; R42.1@4546.65,2402.26 4546.65,2355.57 R47.2@4553.36,2348.85 4672.85,2348.85 SDCLK0_P.1@4714,2390
  Int6 eMMC High-Speed Data Lines (8-bit bus), SDIO/peripherals w4: v1(4048,2445) 4201.28,2445 4238.16,2408.13 4238.16,2391.84 4261.34,2368.66 4269.66,2368.66 4319.51,2418.51 4667.21,2418.51 4695.72,2390 SDCLK0_P.1@4714,2390 4714,2381 SDCLK0_P.1@4723,2372
SPI_CS0: D15.2 J8.8 R140.2 SPI.4 | length 805
  USB 2.0 (90 Diff) DDR3 Data (50-100) w4: D15.2@4343.71,3097.5 4371.28,3125.08 R140.2@4371.28,3181 4371.28,3184.02 4437,3249.74 J8.8@4437,3460 4437,3762 SPI.4@4365,3834
SPI_MISO: D17.2 J8.6 R138.2 SPI.2 | length 820.4
  USB 2.0 (90 Diff) DDR3 Data (50-100) w4: SPI.2@4565,3834 4637,3762 J8.6@4637,3460 4637,3289.66 4742.64,3184.02 R138.2@4742.64,3181 4742.64,3122.42 D17.2@4717.72,3097.5
SPI_MOSI: D16.2 J8.7 R139.2 SPI.3 | length 785.2
  USB 2.0 (90 Diff) DDR3 Data (50-100) w4: SPI.3@4465,3834 4537,3762 J8.7@4537,3460 4545.68,3451.32 4545.68,3191.97 R139.2@4556.64,3181 4556.64,3177.98 4530.72,3152.05 D16.2@4530.72,3097.5
SPI_SCLK: D14.2 J8.9 R141.2 SPI.5 | length 865.6
  USB 2.0 (90 Diff) DDR3 Data (50-100) w4: D14.2@4156.7,3097.5 4156.7,3153.68 4181,3177.98 R141.2@4181,3181 4222.98,3181 4337,3295.02 J8.9@4337,3460 4337,3762 SPI.5@4265,3834
TD_N: D1.2 ETHENET.4 R84.1 U5.16 | length 2012.7
  USB 2.0 (90 Diff) DDR3 Data (50-100) w4: D1.2@1904.87,722.69 1912.06,722.69 1945.49,689.26 1947.84,686.9 cw(c1945,684.09) 1949,684.09 1949,514.66 ccw(c1953,514.66) 1950.16,511.84 1952.51,509.49 2001.26,460.74 2064.99,460.74 2100.5,496.26 2100.5,510.74 ETHENET.4@2184.5,594.74 2218,628.24 2218,634.49 2223.86,640.34 2264.67,640.34 2267.02,638 v1(2310,638) ; v1(1918.69,1219.31) 1919.37,1220 1934.97,1220 1942,1212.97 1942,1203.03 1924.82,1185.85 1880.13,1185.85 1866.39,1172.1 R84.1@1866.39,1168.17 1878.57,1155.98 1878.57,1145.61 1880.92,1143.26 1894.63,1143.26 2027.24,1275.87 2055.8,1275.87 2063.85,1281.97 U5.16@2090.39,1285.87
  DDR3 Fly-by Routing (Address, Command, Control), QSPI Flash (Clk, IO) w4: v1(1918.69,1219.31) 1933.87,1234.5 1957.81,1234.5 1960.16,1232.16 2009.51,1182.8 2009.51,1172.86 1989,1152.34 1989,823.34 2147.34,665 2283,665 v1(2310,638)
TD_P: D1.1 ETHENET.3 R80.2 U5.17 | length 2072.3
  USB 2.0 (90 Diff) DDR3 Data (50-100) w4: D1.1@1904.87,703 1912.06,703 1938.81,676.25 1938.81,511.87 1963.63,487.06 1997.95,452.74 2092.5,452.74 ETHENET.3@2134.5,494.74 2224,584.24 2224,632 2226.34,634.34 2262.19,634.34 2269.79,626.74 v1(2321.31,626.69) v1(2321.31,626.69) ; v1(1930,1208) 1928.48,1206.48 1860.78,1206.48 1844.64,1190.34 1844.64,1130.32 1866.86,1108.1 R80.2@1866.86,1104.17 1878.85,1116.16 1878.85,1126.92 1881.19,1129.26 1900.43,1129.26 2033.04,1261.87 U5.17@2069.15,1261.87
  DDR3 Fly-by Routing (Address, Command, Control), QSPI Flash (Clk, IO) w4: v1(1930,1208) 1948.5,1226.5 1954.5,1226.5 2001.51,1179.49 2001.51,1176.17 1981,1155.66 1981,820.03 2144.03,657 2270.33,657 2301.33,626 2320.63,626 v1(2321.31,626.69)
TX_RS485: MCIMX6Y2DVM08AB.H17 R97.2 U10.4 | length 4256.1
  USB 2.0 (90 Diff) DDR3 Data (50-100) w4: U10.4@721.38,1896.14 812.61,1896.14 R97.2@816.47,1900 816.47,1903.94 830.22,1917.69 834.16,1917.69 856.66,1940.19 cw(c859.49,1937.36) 859.49,1941.36 1119.34,1941.36 ccw(c1119.34,1945.36) 1122.16,1942.52 1155.84,1976.2 ccw(c1153,1979.02) 1157,1979.02 1157,2365 cw(c1161,2364.97) 1158.15,2367.77 1699.28,2908.91 cw(c1702.11,2906.08) 1702.11,2910.08 1754.21,2910.08 cw(c1754.18,2906.08) 1754.87,2910.02 ccw(c1755.6,2913.95) 1755.6,2909.95 1830.4,2909.95 ccw(c1830.4,2913.95) 1831.13,2910.02 cw(c1831.82,2906.08) 1831.79,2910.08 1961.04,2910.08 2069.96,3019 2832,3019 3133,2718 3133,2676 3215.49,2593.51 3503.49,2593.51 3524,2573 3524,2535.96 3542,2517.96 3542,2478.26 3541.75,2478.01 3551.7,2468.06 3551.7,2451.57 v1(3553,2443) ; 3339.81,2164.53 MCIMX6Y2DVM08AB.H17@3350.28,2174.99
  Escapes, non-critical tracks, decoupling capacitor vias w4: v1(3333,2163) 3344,2174 3367.97,2174 3378,2184.03 3378,2205.12 3377,2206.12 3377,2248.14 3445.15,2316.29 3445.15,2332.85 3510.07,2397.78 ; 3510.07,2397.83 3513.6,2401.35 3513.6,2415.54 3531.63,2433.57 3543.57,2433.57 v1(3553,2443)
UART_RX: D11.2 J8.2 R136.2 UART.2 | length 774.4
  USB 2.0 (90 Diff) DDR3 Data (50-100) w4: UART.2@5048,3828 5042.5,3822.5 5042.5,3465.5 J8.2@5037,3460 5110.64,3386.36 R136.2@5110.64,3178 5110.64,3109.82 D11.2@5095.7,3094.88
UART_TX: D10.2 J8.3 R137.2 UART.3 | length 749.7
  USB 2.0 (90 Diff) DDR3 Data (50-100) w4: D10.2@4907.71,3095.88 4907.71,3177.93 R137.2@4906.64,3179 4906.64,3429.64 J8.3@4937,3460 4942.5,3465.5 4942.5,3822.5 UART.3@4948,3828
USB1_N: DEVICE_1.2 MCIMX6Y2DVM08AB.T15 U6.6 | length 5410
  USB 2.0 (90 Diff) DDR3 Data (50-100) w4.92: U6.6@1431.63,527.32 1431.63,531.06 1438.95,538.37 1438.95,538.5 1443.88,543.42 1478.44,543.42 1483.37,538.5 1483.37,485.82 1472.97,475.43 1472.97,386.89 1476.76,383.11 1476.82,383.11 1479,380.92 1613.81,380.92 1621.92,372.81 1621.92,255.19 1613.81,247.08 1426.97,247.08 1418.86,255.19 1418.86,281.71 DEVICE_1.2@1381.95,318.62 1381.95,279.26 1366.6,263.91 1366.6,375.13 ccw(c1361.68,375.1) 1363.93,379.48 cw(c1369.2,389.57) 1357.81,389.57 1357.81,460.43 cw(c1369.2,460.43) 1363.98,470.55 ccw(c1361.68,474.9) 1366.6,474.87 1366.6,484.16 ccw(c1361.68,484.13) 1362.5,488.98 cw(c1364.5,500.19) 1353.11,500.19 1353.11,523.81 cw(c1364.5,523.81) 1359.99,534.26 ccw(c1358,538.77) 1362.93,538.73 1362.93,540.64 cw(c1376.31,540.64) 1365.63,548.71 ccw(c1361.68,551.64) 1366.6,551.61 1368.52,2353.84 1368.56,2387.24 cw(c1373.48,2387.21) 1369.06,2389.36 1369.74,2390.77 cw(c1380.4,2385.61) 1371.99,2393.95 1789.58,2811.53 cw(c1797.95,2803.16) 1792.7,2813.77 1794.15,2814.49 cw(c1796.33,2810.08) 1796.33,2815 2744.39,2815 cw(c2744.39,2810.08) 2746.57,2814.49 2748.02,2813.77 cw(c2742.77,2803.16) 2751.13,2811.55 3065.11,2500.39 ccw(c3068.58,2503.89) 3068.58,2498.96 3402.82,2498.96 3425.01,2476.78 3425.01,2452.32 3414.32,2441.63 3414.32,2428.01 MCIMX6Y2DVM08AB.T15@3413.27,2426.96
USB1_P: DEVICE_1.3 MCIMX6Y2DVM08AB.U15 U6.3 | length 5147.3
  USB 2.0 (90 Diff) DDR3 Data (50-100) w4.92: U6.3@1471,497 1467.56,493.56 1467.56,482.63 1464.05,479.12 1464.05,383.2 1475.25,372 1610.12,372 1613,369.12 1613,258.88 1610.12,256 1430.67,256 1427.78,258.88 1427.78,285.71 DEVICE_1.3@1460.69,318.62 1454,325.31 1424.77,325.31 1396.45,353.63 1380.44,353.63 cw(c1380.44,358.55) 1375.55,357.99 1373.45,376.44 ccw(c1361.68,375.1) 1367.17,385.59 cw(c1369.2,389.57) 1364.74,389.57 1364.74,460.43 cw(c1369.2,460.43) 1367.18,464.41 ccw(c1361.68,474.9) 1373.52,474.87 1373.52,484.15 ccw(c1361.68,484.13) 1363.75,495.79 cw(c1364.5,500.19) 1360.04,500.19 1360.04,523.81 cw(c1364.5,523.81) 1362.76,527.92 ccw(c1358,538.77) 1369.85,538.73 1369.85,540.64 cw(c1376.31,540.64) 1371.16,544.55 ccw(c1361.68,551.64) 1373.52,551.6 1375.48,2381.54 1375.48,2385.63 cw(c1380.4,2385.61) 1376.91,2389.07 1794.49,2806.65 cw(c1797.95,2803.16) 1797.95,2808.08 2742.77,2808.08 cw(c2742.77,2803.16) 2746.23,2806.65 3060.24,2495.47 ccw(c3068.58,2503.89) 3061.49,2494.4 3066.01,2491.02 ccw(c3068.96,2494.97) 3068.96,2490.04 3381.68,2490.04 MCIMX6Y2DVM08AB.U15@3413.27,2458.46
USB2_N: DEVICE_2.2 MCIMX6Y2DVM08AB.T13 U7.6 | length 5998.6
  USB 2.0 (90 Diff) DDR3 Data (50-100) w4: U7.6@635.32,513.16 635.32,516.9 653.04,534.62 698.59,534.62 712.41,548.44 712.41,593.56 661.97,644 500.66,644 461,604.34 461,338.88 520.25,279.63 582.31,279.63 615.17,312.48 648.02,312.48 DEVICE_2.2@649.71,314.17 686.22,350.68 753.65,350.68 782.34,379.38 1038.72,379.38 1343.36,684.02 ccw(c1340.52,686.84) 1344.52,686.83 1345.5,2401.81 cw(c1349.5,2401.78) 1345.7,2403.03 1345.98,2403.89 cw(c1355.5,2400.84) 1348.4,2407.88 1768.6,2828.09 cw(c1775.66,2821) 1775.66,2831 2751.35,2831 cw(c2751.35,2821) 2758.36,2828.13 2758.97,2827.52 3069.52,2519.69 3077.79,2511.43 3423.57,2511.43 3463,2472 3478.67,2472 3487.54,2463.13 3487.54,2438.24 MCIMX6Y2DVM08AB.T13@3476.26,2426.96
USB2_P: DEVICE_2.3 MCIMX6Y2DVM08AB.U13 U7.3 | length 5979.1
  USB 2.0 (90 Diff) DDR3 Data (50-100) w4: U7.3@674.68,482.84 674.68,486.58 720.41,532.31 720.41,596.88 665.29,652 497.34,652 453,607.66 453,335.57 516.94,271.63 656.02,271.63 693.91,309.52 723.79,309.52 DEVICE_2.3@728.45,314.17 785.66,371.38 1042.04,371.38 1348.01,677.35 ccw(c1345.16,680.16) 1349.07,679.28 1350.28,684.63 ccw(c1340.52,686.84) 1350.52,686.83 1351.5,2397.53 1351.5,2400.87 cw(c1355.5,2400.84) 1352.66,2403.66 1772.84,2823.84 cw(c1775.66,2821) 1775.66,2825 2751.35,2825 cw(c2751.35,2821) 2754.17,2823.84 2756.5,2821.52 3065.32,2515.41 3075.3,2505.43 3417.64,2505.43 3457.06,2466 3460.95,2466 3468.49,2458.46 MCIMX6Y2DVM08AB.U13@3476.26,2458.46
VCC_3V3: C54.1 C55.1 C56.1 C61.2 C62.2 C63.1 C64.1 C65.1 C66.1 C67.1 C68.1 C69.1 C70.2 EMMC.E6 EMMC.F5 EMMC.J10 EMMC.K9 FB1.2 pad.86 pad.87 pad.88 pad.89 pad.90 pad.92 pad.93 pad.94 pad.95 pad.96 pad.97 pad.98 pad.99 pad.293 pad.294 pad.295 pad.296 pad.298 | length 27.8
  USB 2.0 (90 Diff) DDR3 Data (50-100) w5: EMMC.E6@2381.92,2022.91 EMMC.F5@2401.6,2042.59
VCCQ_1V8: C57.1 C58.1 C59.1 C71.2 C72.2 C73.1 C74.1 C75.1 C76.1 C77.1 C78.1 C79.1 C80.2 EMMC.C6 EMMC.M4 EMMC.N4 EMMC.P3 EMMC.P5 FB2.2 pad.75 pad.76 pad.77 pad.78 pad.79 pad.80 pad.81 pad.82 pad.83 pad.84 pad.85 pad.100 pad.101 pad.103 pad.107 pad.113 pad.283 pad.285 pad.286 pad.287 R53.1 R54.2 R55.1 R56.1 R57.1 R58.1 R59.1 R60.1 R61.1 R62.1 | length 3493.9
  USB 2.0 (90 Diff) DDR3 Data (50-100) w10: EMMC.P5@2401.6,2200.08 2415.53,2213.96 2427.04,2213.96 2435.18,2205.83 EMMC.P3@2435.18,2200.08 ; EMMC.N4@2421.29,2180.39 EMMC.P3@2440.97,2200.08
  USB 2.0 (90 Diff) DDR3 Data (50-100) w12: C58.1@1874.21,2493 1874.21,2454.8 ; FB2.2@1932,2337 1878.57,2390.43 1878.57,2411.43 C74.1@1878,2412 1878,2412.81 1874.21,2416.6 1874.21,2454.8 ; C59.1@1999,2411 1999.11,2411.11 1999.11,2455.47 ; C75.1@2059.68,2410 2059.84,2410.16 2059.84,2450.9 ; C80.2@2243.74,2410 2244.13,2410.39 2244.13,2459.32 ; v1(2283,2080) 2283,2022.03 2301.81,2003.22 2374.78,2003.22 2381.58,1996.42 2381.58,1983.88 EMMC.C6@2381.92,1983.54 ; C79.1@2309.68,2410 2309.84,2410.16 2309.84,2450.9 ; EMMC.M4@2421.29,2160.7 EMMC.N4@2421.29,2180.39 ; C72.2@2489.21,2410 2489.37,2410.16 2489.37,2449 ; C77.1@2552.47,2410 2552.47,2410.81 2547.94,2415.34 R53.1@2547.94,2489 2547.13,2489 2544.34,2491.8 C76.1@2489.53,2491.8 2489.37,2491.64 2489.37,2449 ; 1874.21,2454.8 1874.89,2455.47 1999.11,2455.47 ; 1999.11,2455.47 1999.11,2484.89 C57.1@1999.21,2485 2052.39,2485 2059.19,2491.8 C73.1@2060,2491.8 2059.84,2491.64 2059.84,2450.9 ; 2059.84,2450.9 2235.72,2450.9 2244.13,2459.32 ; 2244.13,2459.32 2244.13,2491.4 C71.2@2244.53,2491.8 C78.1@2310,2491.8 2309.84,2491.64 2309.84,2450.9 ; 2309.84,2450.9 2487.47,2450.9 2489.37,2449
  Int4 PWR w22: pad.78@2127.12,1663.17 2328.95,1865 2493.11,1865 2526,1897.89 2526,2373.21 pad.113@2489.21,2410 ; v1(2283,2080) 2230.96,2080 2229,2081.96 2229,2370 2269,2410 pad.113@2489.21,2410 ; pad.286@2440.97,2200.08 2440.97,2361.76 pad.113@2489.21,2410
VDD_HIGH_CAP: C14.1 C42.1 C43.1 MCIMX6Y2DVM08AB.N6 MCIMX6Y2DVM08AB.R14 MCIMX6Y2DVM08AB.R15 | length 1796.2
  USB 2.0 (90 Diff) DDR3 Data (50-100) w4: v1(3617,2317) 3618.26,2318.26 3645,2318.26 3669.94,2318.26 3670.44,2318.76
  USB 2.0 (90 Diff) DDR3 Data (50-100) w5: v1(3294,2443) 3321.82,2415.18 3393.56,2415.18 MCIMX6Y2DVM08AB.R15@3413.27,2395.46 MCIMX6Y2DVM08AB.R14@3444.76,2395.46 v1@3459.65,2410.3 ; 3645,2318.26 3645.52,2317.74 3645.52,2297.72 3645.5,2274.38 ; 3645.52,2274.36 3645.52,2075.62 3634.66,2064.76 3632.82,2064.76 3621.96,2053.89 3621.96,2052.06 3599.2,2029.3 3597.36,2029.3 3590.46,2022.39 3590.46,2012.63 3598.61,2004.48 3600.44,2004.48 3614.03,1990.9 3614.03,1981.14 3602.93,1970.04 3601.1,1970.04 3590,1958.94 3590,1941 3633.01,1897.99 3669.82,1897.99 3676.32,1891.49 3684.89,1891.49 3700.82,1875.56 3700.82,1850 ; 3670.44,2318.76 3683.02,2318.76 MCIMX6Y2DVM08AB.N6@3696.73,2332.47
  USB 2.0 (90 Diff) DDR3 Data (50-100) w22: C43.1@3511.12,1627.87 3512,1628.76 3512,1661.18 3700.82,1850
  USB 2.0 (90 Diff) DDR3 Data (50-100) w32: C14.1@3035,2303.47 3035.25,2303.72 3076.12,2303.72 3096,2323.6 v1(3096,2377) ; C42.1@3506.59,1555.87 3507.55,1555.87 3509.39,1557.71 3509.39,1558.67 3511.12,1560.4 C43.1@3511.12,1627.87
  Int4 PWR w5: v1(3459.7,2410.3) 3460,2410 3497.9,2410 3534.64,2373.26 3534.64,2353.51 3571.15,2317 v1(3617,2317)
  Int4 PWR w32: v1(3096,2377) 3162,2443 v1(3294,2443)
VDD_OTG1_VBUS: C101.1 MCIMX6Y2DVM08AB.T12 pad.55 pad.56 R89.2 | length 4195.9
  USB 2.0 (90 Diff) DDR3 Data (50-100) w5: 3080.6,2577.4 3080.6,2527.4 3090,2518 3426.19,2518 3462.11,2482.08 3477.79,2482.08 3494.04,2465.82 3494.04,2440.67 MCIMX6Y2DVM08AB.T12@3507.76,2426.96
  USB 2.0 (90 Diff) DDR3 Data (50-100) w22: v1(1536,658) 1536,576.2 C101.1@1551.18,561.02 ; v1@2666.95,2851.95 2806.05,2851.95 3080.6,2577.4
  Int4 PWR w55: v1(1536,658) 1628,750 1628,886 1627,887 1627,2355 1823,2551 2447.13,2551 2669,2772.87 v1(2669,2854)
VDD_OTG2_VBUS: C103.1 MCIMX6Y2DVM08AB.U12 pad.49 pad.50 R90.2 | length 5114.4
  USB 2.0 (90 Diff) DDR3 Data (50-100) w4: 3224,2571 3231.83,2578.83
  USB 2.0 (90 Diff) DDR3 Data (50-100) w5: 3231.83,2578.83 3237.23,2584.23 3439.75,2584.23 3439.9,2584.09 3495,2584.09 3495.85,2584.94 3499.99,2584.94 3515,2569.93 3515,2529 3533.5,2510.5 3533.5,2472.65 3521.14,2460.29 3509.59,2460.29 MCIMX6Y2DVM08AB.U12@3507.76,2458.46
  USB 2.0 (90 Diff) DDR3 Data (50-100) w22: v1(2688,2927) 2690,2925 2859,2925 3213,2571 3224,2571
  USB 2.0 (90 Diff) DDR3 Data (50-100) w25: C103.1@754,544.06 827.94,618 v1(872,618)
  Int4 PWR w55: v1(872,618) 1362,618 1538,794 1538,2621 1722,2805 2429,2805 2551,2927 v1(2688,2927)
VDD_SOC_IN: 1V4.2 C32.1 C33.1 C34.1 C35.1 C122.2 C123.2 C125.2 L3.2 MCIMX6Y2DVM08AB.H9 MCIMX6Y2DVM08AB.H10 MCIMX6Y2DVM08AB.J9 MCIMX6Y2DVM08AB.J10 MCIMX6Y2DVM08AB.K9 MCIMX6Y2DVM08AB.K10 pad.33 pad.34 pad.36 R144.2 R146.2 R162.1 | length 13007.6
  USB 2.0 (90 Diff) DDR3 Data (50-100) w4: 3487.54,1993.95 3487.54,1981.34 3484.86,1978.66 3484.86,1961.88 3492.93,1953.81 3492.93,1919.07 3501,1911 3501,1887 v1(3514,1874) ; 3522.29,2173.28 3522.29,2173.99 3534.58,2186.28 3535,2186.28 3555.21,2206.49 MCIMX6Y2DVM08AB.J10@3570.75,2206.49
  USB 2.0 (90 Diff) DDR3 Data (50-100) w5: 3487.54,1993.95 3483.36,1998.14 3455.25,1998.14 3451.26,2002.12 3451.26,2007.35 3456.55,2012.63 3456.55,2023.68 3451.84,2028.38 3451.84,2039.42 3461.42,2049 3461.42,2102.09 3464.26,2104.92 3464.26,2116.97 3476.37,2129.08 3513.96,2129.08 3522.29,2137.41 3522.29,2173.28 ; MCIMX6Y2DVM08AB.H10@3570.75,2174.99 MCIMX6Y2DVM08AB.H9@3602.24,2174.99 MCIMX6Y2DVM08AB.J9@3602.24,2206.49 MCIMX6Y2DVM08AB.K9@3602.24,2237.98 MCIMX6Y2DVM08AB.K10@3570.75,2237.98 MCIMX6Y2DVM08AB.J10@3570.75,2206.49
  USB 2.0 (90 Diff) DDR3 Data (50-100) w15: 2204,3895 2204.18,3895.18 ; 2245.24,3895.18 R162.1@2431.61,3895.18
  USB 2.0 (90 Diff) DDR3 Data (50-100) w22: 1V4.2@158,2403 158,2354.54 R146.2@159.54,2353 114,2307.46 114,2205 142.65,2176.35 L3.2@234,2176.35 234,2166 273,2127 330.46,2127 373.97,2170.5 C122.2@435,2170.5 ; C122.2@435,2174.42 435,2173.81 443.81,2165 544,2165 583.5,2204.5 ; C123.2@508,2290.16 570.84,2290.16 591,2270 591,2212 ; v1(591,2123) 591,2204.5 ; 2204,3895 2153,3946 652,3946 233,3527 233,3155 494,2894 849,2894 1068,2675 1068,2521 751.5,2204.5 591,2204.5 ; 2204.18,3895.18 2245.24,3895.18 ; R162.1@2431,3895.79 R162.1@2431.61,3895.18 ; v1(3078,1329) 3078,1365 3121,1408 3241,1408 3258.74,1425.74 3258.74,1557.46 C32.1@3258.19,1558.02 3258.64,1558.47 3258.64,1636.02 C35.1@3259.1,1636.47 C34.1@3259.1,1712.53 ; C34.1@3259.1,1716.47 3258,1717.57 3258,1775 3275,1792 v1(3297,1792) ; 583.5,2204.5 591,2212 ; 583.5,2204.5 591,2204.5 ; 591,2204.5 591,2212
  USB 2.0 (90 Diff) DDR3 Data (50-100) w25: C34.1@3259.1,1712.53 C34.1@3259.1,1716.47
  Int4 PWR w55: v1(591,2123) 499.1,2031.1 247.26,2031.1 215.04,1998.88 215.04,562 473,304.04 473,302 493.24,281.76 493.24,273.41 651.65,115 1702.72,115 1785.06,197.34 1785.06,359.9 1867.4,442.24 1989.28,442.24 2040.52,391 2321,391 2595.5,665.5 3024.5,665.5 3078,719 v1(3078,1329) ; v1(3297,1792) 3355,1850 3490,1850 v1(3514,1874)
VDD_USB_CAP: C40.1 C41.1 MCIMX6Y2DVM08AB.R12 | length 892.3
  USB 2.0 (90 Diff) DDR3 Data (50-100) w5: MCIMX6Y2DVM08AB.R12@3507.76,2395.46 v1(3523.6,2411.4)
  USB 2.0 (90 Diff) DDR3 Data (50-100) w22: C41.1@2967,2239.22 2973.84,2246.06 C40.1@3034,2246.06
  USB 2.0 (90 Diff) DDR3 Data (50-100) w32: C41.1@2967,2238.66 2967,2239.22 2967,2379 3000,2412 v1(3037,2412)
  Int4 PWR w5: 3138.25,2487 3160,2487 3175,2472 3463,2472 v1(3523.6,2411.4)
  Int4 PWR w32: v1(3037,2412) 3037,2458 3066,2487 3138.25,2487
Vin: "12V / 28V.1" C124.2 C134.1 C135.1 C136.1 pad.124 pad.125 pad.126 pad.127 pad.131 pad.132 pad.133 R148.2 U11.2 U12.2
Vout: C100.2 C102.2 C108.2 C113.2 C128.2 F1.2 F2.2 L4.2 pad.54 pad.130 pad.244 pad.245 pad.279 pad.280 U8.3 U9.3 U11.5 | length 3007.9
  USB 2.0 (90 Diff) DDR3 Data (50-100) w15: F2.2@705,409 769.47,409 C102.2@772.47,412 772.47,423.47 827,478 ; 978.53,866.62 C108.2@978.53,959 ; 980,849 984,845 U8.3@1048.35,845 ; U9.3@993.69,1299 1049.43,1299 C113.2@1053.15,1295.28 ; U11.5@1162.24,2959 1183.76,2959 1188.07,2954.69 C128.2@1188.07,2874 ; F1.2@1499.12,425 1501.12,423 C100.2@1569.47,423
  USB 2.0 (90 Diff) DDR3 Data (50-100) w55: 827.13,478.76 963.89,615.52 ccw(c925,654.41) 980,654.41 980,849 980,880
  Int4 PWR w15: pad.280@1053.15,1295.28 1389,1631.13 1389,1888 1488,1987 1488,2749 1363,2874 pad.279@1188.07,2874
WF_CLK: R186.1 WIFI.21 | length 62.5
  USB 2.0 (90 Diff) DDR3 Data (50-100) w4: R186.1@4903.64,317 4905.18,315.46 WIFI.21@4965.5,315.46
WF_CS: U16.1 WIFI.20 | length 862.3
  USB 2.0 (90 Diff) DDR3 Data (50-100) w4: U16.1@4476.27,388 4518,388 4541,365 4541,342 4512,313 4428,313 4414,299 4414,272 4431,255 4634.56,255 4683.37,303.81 4767.59,303.81 4800.76,336.99 4918.27,336.99 4920.1,335.15 WIFI.20@4965.5,335.15
WF_RF_ANT: C162.2 L7.1 WIFI.2 | length 153.2
  USB 2.0 (90 Diff) DDR3 Data (50-100) w4: WIFI.2@5152.5,276.09 5188.41,276.09 C162.2@5198.49,266.02 ; C162.2@5198.49,263.65 C162.2@5198.49,264.83 C162.2@5198.49,266.02 ; L7.1@5273.12,258.08 L7.1@5273.12,263 5273.12,267.92 5254.55,286.49 5218.96,286.49 C162.2@5198.49,266.02
WF_SDIO_DATA0: U16.5 WIFI.22 | length 229.7
  USB 2.0 (90 Diff) DDR3 Data (50-100) w4: U16.5@4759.73,238 4846,238 4868,260 4920.86,260 4956.64,295.78 WIFI.22@4965.5,295.78
WF_SDIO_DATA1: U16.2 WIFI.23 | length 781.6
  USB 2.0 (90 Diff) DDR3 Data (50-100) w4: U16.2@4476.27,338 4427,338 4398,309 4398,237 4441,194 4820,194 4876,250 4930.54,250 4956.64,276.09 WIFI.23@4965.5,276.09
WF_SDIO_DATA2: U16.3 WIFI.18 | length 551.2
  USB 2.0 (90 Diff) DDR3 Data (50-100) w4: U16.3@4476.27,288 4495.95,288 4613.76,405.81 4788,405.81 4819.5,374.31 4926.9,374.31 4927.11,374.52 WIFI.18@4965.5,374.52
WF_SDIO_DATA3: U16.7 WIFI.19 | length 212.7
  USB 2.0 (90 Diff) DDR3 Data (50-100) w4: U16.7@4759.73,338 4779.42,338 4796.25,354.83 WIFI.19@4965.5,354.83
WF_XTALI: C165.2 WIFI.28 Y3.1 | length 242.3
  USB 2.0 (90 Diff) DDR3 Data (50-100) w4.6: Y3.1@5034.46,63.69 5062.02,63.69 5067.1,68.77 ; WIFI.28@5049.16,231.8 5049.16,194.67 5067.1,176.73 5067.1,68.77 ; C165.2@5102,63.39 5072.47,63.39 5067.1,68.77
WF_XTALO: C166.2 WIFI.27 Y3.3 | length 178.6
  USB 2.0 (90 Diff) DDR3 Data (50-100) w4.6: C166.2@4895,151 4966.84,151 4988.86,173.02 4988.86,182.33 5029.47,222.94 WIFI.27@5029.47,231.8
X1: R70.1 U5.34 | length 123.8
  USB 2.0 (90 Diff) DDR3 Data (50-100) w4: R70.1@2320,948.64 2324.46,953.1 ccw(c2321.63,955.93) 2325.63,955.93 U5.34@2325.63,1070.32
XTALI: MCIMX6Y2DVM08AB.T16 U1.3 | length 933.5
  USB 2.0 (90 Diff) DDR3 Data (50-100) w4.92: U1.3@3029,1988 3029,1991 3004.96,2015.04 2989.13,2015.04 2944.7,2059.47 2944.7,2385.64 3031.27,2472.2 3279.59,2472.2 3305.08,2446.71 3347.13,2446.71 3366.88,2426.96 MCIMX6Y2DVM08AB.T16@3381.77,2426.96
pads on no net: "12V / 28V.3" B1.7 B2.7 CSI_FPC.1 CSI_FPC.12 CSI_FPC.14 D1.6 D1.7 D1.9 D1.10 DRAM.A1 DRAM.A8 DRAM.A9 DRAM.B1 DRAM.B2 DRAM.B3 DRAM.B9 DRAM.C1 DRAM.C9 DRAM.D1 DRAM.D2 DRAM.D8 DRAM.D9 DRAM.E1 DRAM.E2 DRAM.E8 DRAM.E9 DRAM.F1 DRAM.F9 DRAM.G1 DRAM.G7 DRAM.G8 DRAM.G9 DRAM.H1 DRAM.H2 DRAM.H9 DRAM.J2 DRAM.J8 DRAM.K2 DRAM.K8 DRAM.M1 DRAM.M7 DRAM.M8 DRAM.M9 DRAM.N1 DRAM.N9 DRAM.P1 DRAM.P9 DRAM.R1 DRAM.R9 DRAM.T1 DRAM.T9 EMMC.A1 EMMC.A2 EMMC.A7 EMMC.A8 EMMC.A9 EMMC.A10 EMMC.A11 EMMC.A12 EMMC.A13 EMMC.A14 EMMC.B1 EMMC.B7 EMMC.B8 EMMC.B9 EMMC.B10 EMMC.B11 EMMC.B12 EMMC.B13 EMMC.B14 EMMC.C1 EMMC.C3 EMMC.C5 EMMC.C7 EMMC.C8 EMMC.C9 EMMC.C10 EMMC.C11 EMMC.C12 EMMC.C13 EMMC.C14 EMMC.D1 EMMC.D2 EMMC.D3 EMMC.D4 EMMC.D12 EMMC.D13 EMMC.D14 EMMC.E1 EMMC.E2 EMMC.E3 EMMC.E5 EMMC.E8 EMMC.E9 EMMC.E10 EMMC.E12 EMMC.E13 EMMC.E14 EMMC.F1 EMMC.F2 EMMC.F3 EMMC.F10 EMMC.F12 EMMC.F13 EMMC.F14 EMMC.G1 EMMC.G2 EMMC.G3 EMMC.G10 EMMC.G12 EMMC.G13 EMMC.G14 EMMC.H1 EMMC.H2 EMMC.H3 EMMC.H12 EMMC.H13 EMMC.H14 EMMC.J1 EMMC.J2 EMMC.J3 EMMC.J12 EMMC.J13 EMMC.J14 EMMC.K1 EMMC.K2 EMMC.K3 EMMC.K6 EMMC.K7 EMMC.K10 EMMC.K12 EMMC.K13 EMMC.K14 EMMC.L1 EMMC.L2 EMMC.L3 EMMC.L12 EMMC.L13 EMMC.L14 EMMC.M1 EMMC.M2 EMMC.M3 EMMC.M7 EMMC.M8 EMMC.M9 EMMC.M10 EMMC.M11 EMMC.M12 EMMC.M13 EMMC.M14 EMMC.N1 EMMC.N3 EMMC.N6 EMMC.N7 EMMC.N8 EMMC.N9 EMMC.N10 EMMC.N11 EMMC.N12 EMMC.N13 EMMC.N14 EMMC.P1 EMMC.P2 EMMC.P7 EMMC.P8 EMMC.P9 EMMC.P10 EMMC.P11 EMMC.P12 EMMC.P13 EMMC.P14 ETHENET. ETHENET.9 ETHENET.S1 ETHENET.S2 JTAG.3 JTAG.11 JTAG.17 JTAG.19 LCD_RGB.35 LCD_RGB.37 LCD_RGB.38 LCD_RGB.39 LCD_RGB.40 MCIMX6Y2DVM08AB.A15 MCIMX6Y2DVM08AB.B17 MCIMX6Y2DVM08AB.C16 MCIMX6Y2DVM08AB.D16 MCIMX6Y2DVM08AB.E9 MCIMX6Y2DVM08AB.F14 MCIMX6Y2DVM08AB.N8 MCIMX6Y2DVM08AB.N9 MCIMX6Y2DVM08AB.N10 MCIMX6Y2DVM08AB.N11 MCIMX6Y2DVM08AB.P9 MCIMX6Y2DVM08AB.P10 MCIMX6Y2DVM08AB.P11 MCIMX6Y2DVM08AB.P16 MCIMX6Y2DVM08AB.P17 MCIMX6Y2DVM08AB.R6 MCIMX6Y2DVM08AB.R9 MCIMX6Y2DVM08AB.R10 MCIMX6Y2DVM08AB.R13 MCIMX6Y2DVM08AB.T9 MCIMX6Y2DVM08AB.T17 MCIMX6Y2DVM08AB.U9 MCIMX6Y2DVM08AB.U16 ON/OFF.2 ON/OFF.4 RESET.2 RESET.4 SD_CARD.9 SD_CARD.10 SD_CARD.11 SD_CARD.12 SD_CARD.13 SD_CARD.14 U5.1 U5.9 U5.10 U5.11 U5.12 U5.25 U5.33 U5.38 U5.42 U5.45 U5.46 U6.2 U6.5 U7.2 U7.5 U13.2 U13.3 U13.4 U13.5 U17.4 WIFI.5 WIFI.9 WIFI.10 WIFI.16 WIFI.24 Y2.1
copper on no net: | length 736.4
  USB 2.0 (90 Diff) DDR3 Data (50-100) w3: 772.04,3579.63 772.04,3688.04 812,3728 893,3728 914,3707 914,3691 917,3688 1011,3688 1016,3683 1016,3645 1005,3634 909,3634 896,3647 847.28,3647 837.88,3637.6 ccw(c840,3635.47) 837,3635.47 837,3603 813.63,3579.63 772.04,3579.63

## Polygon pours and split planes (outlines as drawn)
NVCC_CSI on Int4 PWR "NVCC_CSI_L04_P078" (solid, remove dead copper, pour order 78): 2665,1915.08 3337,1915.08 3337,2584 3539.25,2584 3539.25,2138 3998.87,2138 4087.97,2048.9 4087.97,1882.37 3564.97,1882.37 3542.36,1904.98 3480.98,1904.98 3405,1829 2665,1829
Vout on Int4 PWR "VOUT_L04_P069" (solid, remove dead copper, pour order 69): 1929.13,2992.13 1118.11,2992.13 1118.11,1385.11 1118,1385 1118,1377 944.88,1377 944.88,1271.65 944.88,932 1152,932 1152,1237 1348.62,1237 1348.62,1326.38 1348.62,2830.02 1925.88,2830.02 1929.13,2826.77
VCC_3V3 on Int4 PWR "VCC_3V3_L04_P004" (solid, remove dead copper, pour order 4): 1700,2030 1700.58,2030.58 1700.58,2135.91 2412.09,2135.91 2415.83,2132.17 2415.83,2018.83 2411,2014 2095,2014 2095,1822.25 2094.75,1822 1700.58,1822 1700.58,2135.91 1708.08,2135.91 1700.58,2135.91
VCCQ_1V8 on Int4 PWR "VCCQ_1V8_L04_P076" (solid, remove dead copper, pour order 76): 1844.68,2522.53 1897.83,2522.53 1908,2512.36 1908,2456 1969.16,2456 1969.68,2455.47 1976.38,2462.17 1976.38,2522 1980.38,2518 2578,2518 2578,2380.47 2577.53,2380 2479,2380 2479,2147.88 2355,2147.88 2355,2381 1969,2381 1960.57,2372.57 1960.57,2294.57 1959,2293 1891,2293 1891,2339.94 1844.68,2386.26
AVDD on Int4 PWR "AVDD_L04_P071" (solid, remove dead copper, pour order 71): 1996,902 1888.44,902 1888.44,555 2548.74,555 2548.74,742.53 2044.51,740 2044.51,678 1952,678 1952,803 1996,847
NVCC_CSI on Int4 PWR "NVCC_CSI_L04_P082" (solid, remove dead copper, pour order 82): 4206.47,1131.2 4203.89,1854 5003.47,1854 5003.47,2474.2 3067,2524 3067,3922 5819,3922 5819,28 4215.47,28 4215.47,1684.2
NVCC_CSI on Int4 PWR "NVCC_CSI_L04_P073" (solid, remove dead copper, pour order 73): 1965,3514 2114,3514 2114,2764 2344.35,2764 2344.35,2677.02 1733.9,2677.02 1733.9,2758 1987,2758 1987,3313 1971,3329 1325,3329 1300,3354 1300,3505.66 1349.34,3555 1924,3555
NVCC_CSI on Int4 PWR "NVCC_CSI_L04_P075" (solid, remove dead copper, pour order 75): 1735,1917 2882,1917 2882,928.41 2882,778.41 2191.12,778.41 2191.12,747.53 2042,747.53 2042,679.41 1862,679.41 1862,1378.41 1735,1378.41